# Altium PCB DB31.PcbDoc (part 5 of 8)
Units mil, origin at the board's own origin, x right, y up, seen from the top; angles counter-clockwise.
Board outline 3236.22 x 4456.69 mil, 8 copper layers (Top Layer, MidLayer1, MidLayer2, GND-Layer5, MidLayer3, VCC, MidLayer4, Bottom Layer), stack 61.8 mil thick; 226 components, 469 nets, 1815 pads, 1562 vias.
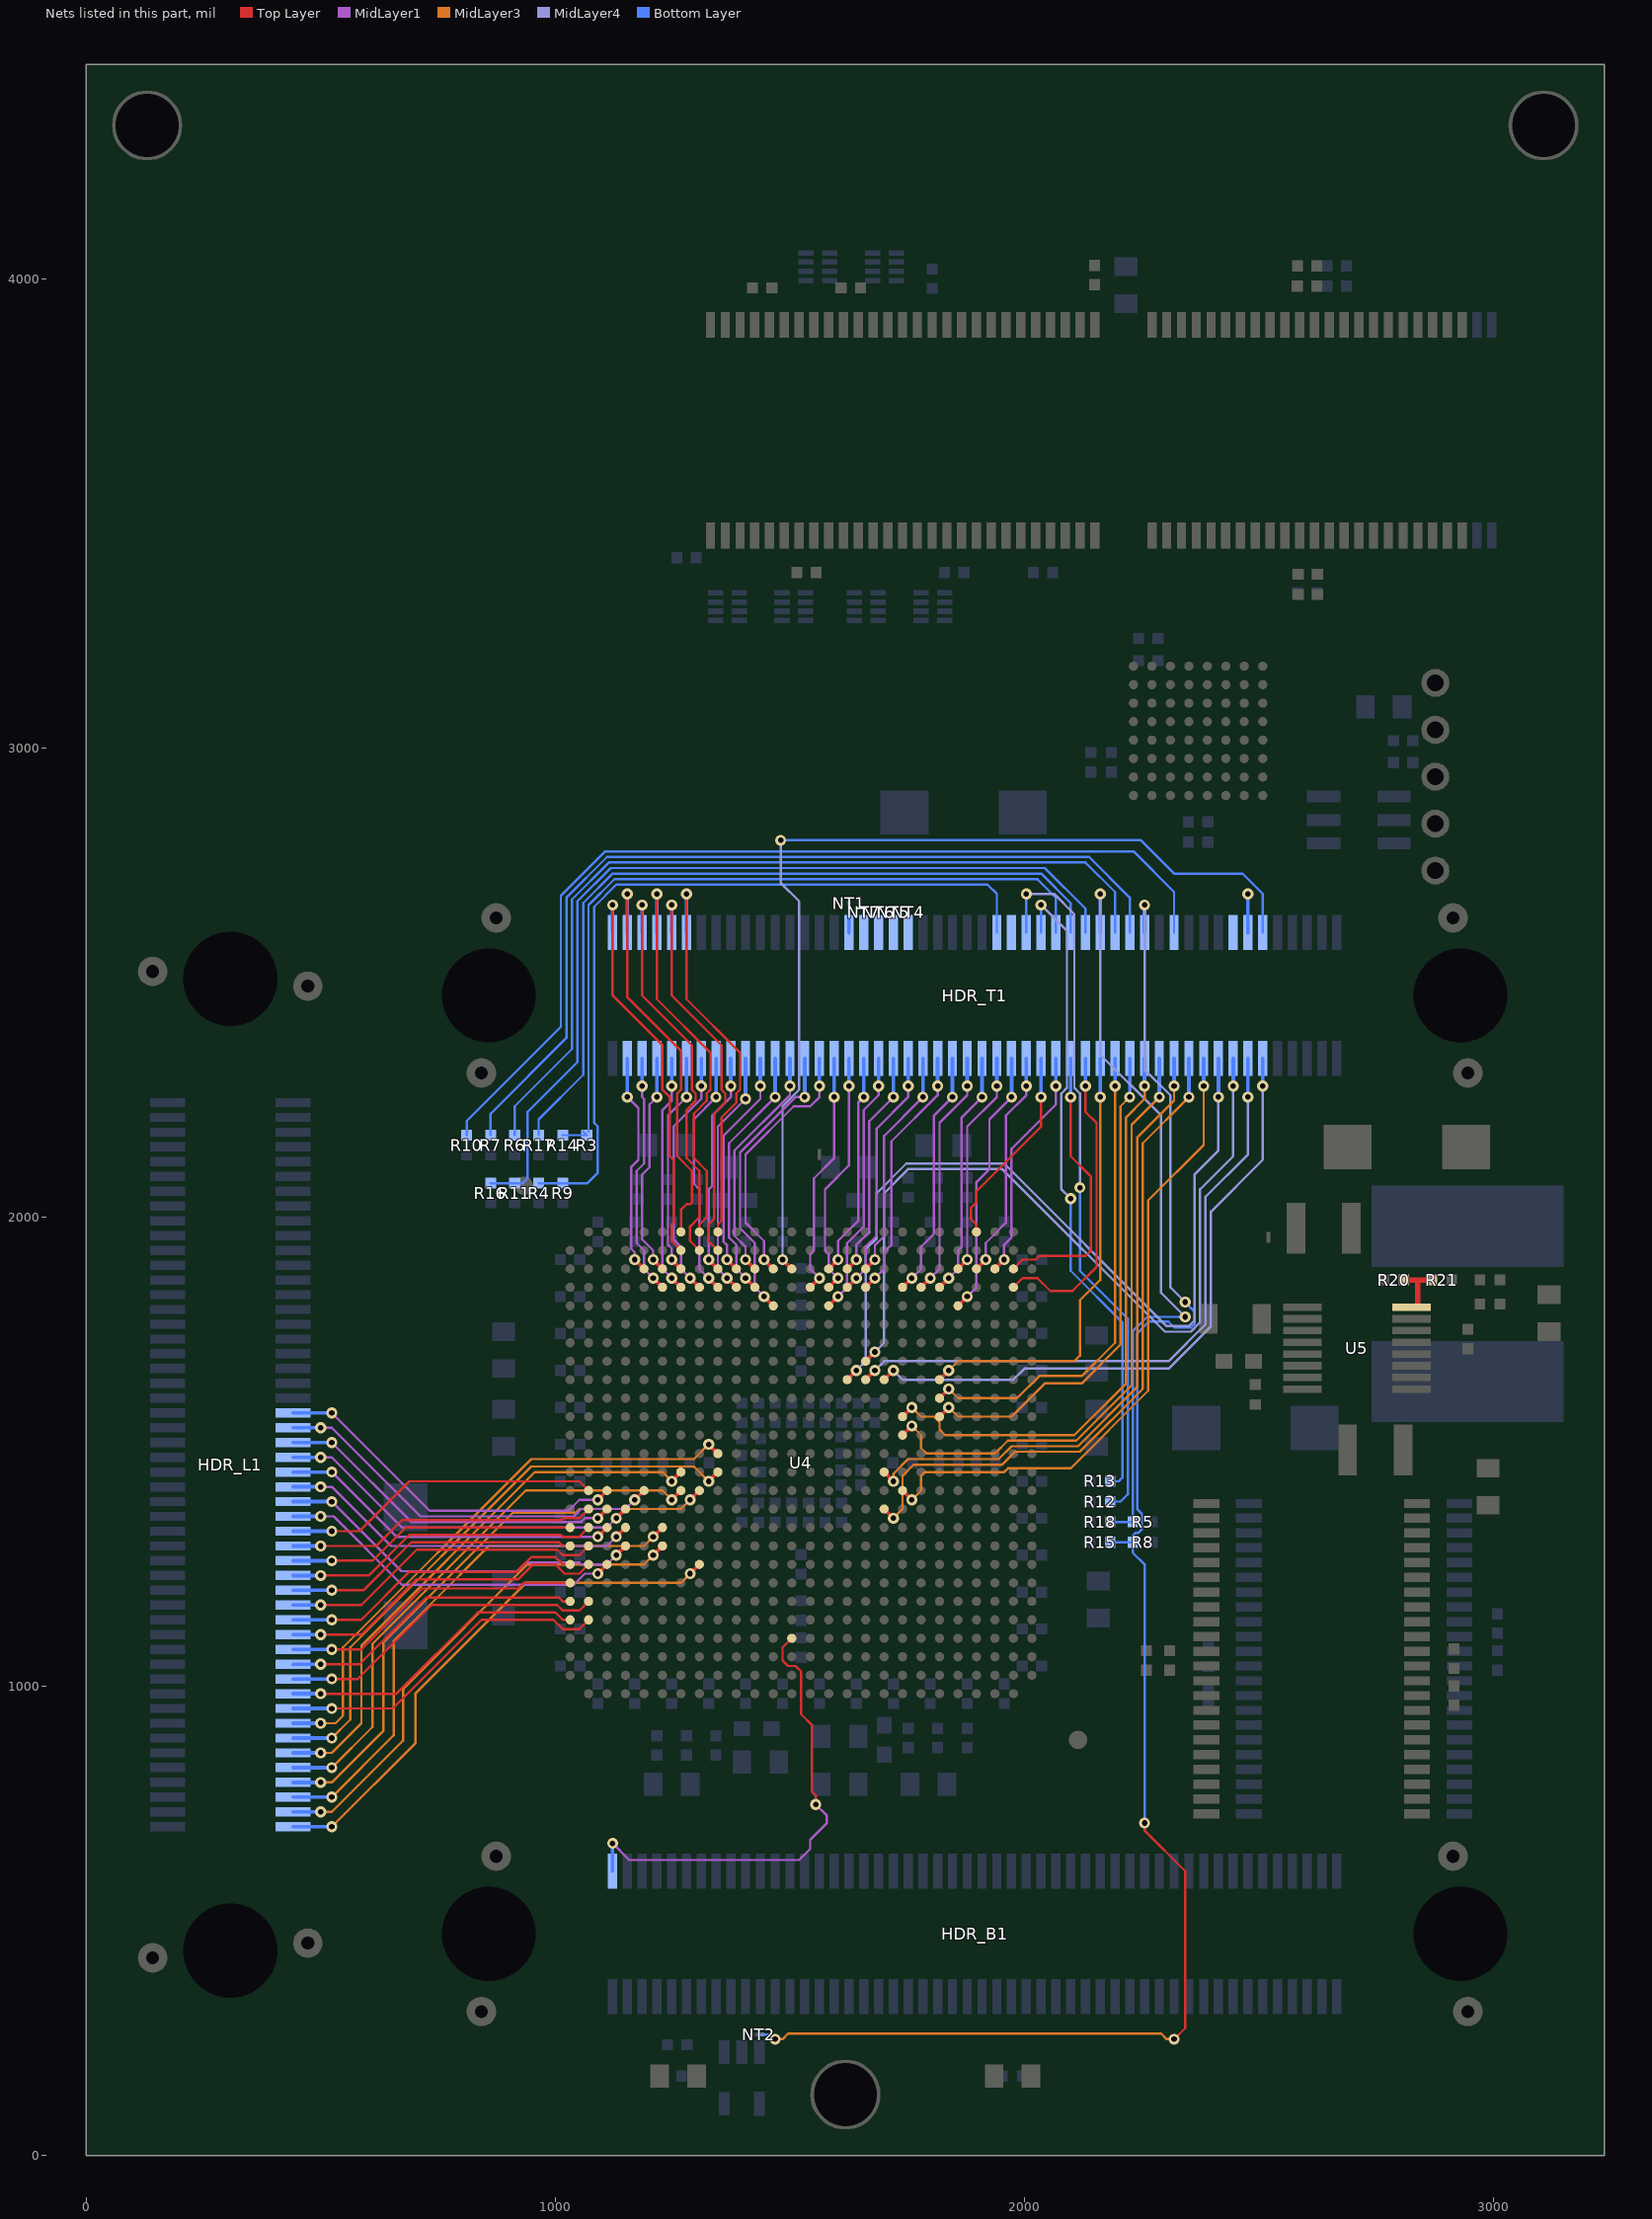
[diagram p11: the nets of this part, all layers, seen from the top]

## Via types
v1: diameter 23.62, hole 11.81, Top Layer to Bottom Layer, 947 vias
v2: diameter 23.62, hole 11.81, Top Layer to Bottom Layer, tented both sides, 476 vias
v3: diameter 27.56, hole 15.75, Top Layer to Bottom Layer, 138 vias
v4: diameter 23.62, hole 11.81, Top Layer to Bottom Layer, tented top, 1 vias

## Nets (pads, with @x,y where several pads share a name; then routed paths per layer and width w, separated by ;. In a path a pad name is that pad's centre, name@x,y a point inside that pad or via, vN(x,y) a via of type N, cw(c..) or ccw(c..) an arc to the next point about the centre after c; other vN are vias at no path point) (continued)
EXTEND_B21: HDR_L1.44 U4.R3 | length 773.7
  Top Layer w7.87: v1(1090.55,1397.64) U4.R3@1110.24,1417.32
  MidLayer1 w5: v2(523.62,1582.68) 732.28,1374.02 956.69,1374.02 968.5,1374.02 1027.56,1374.02 1051.18,1397.64 v1(1090.55,1397.64)
  Bottom Layer w7.87: HDR_L1.44@440.94,1582.67 v2(523.62,1582.68)
EXTEND_B22: HDR_L1.46 U4.R5 | length 849.1
  Top Layer w7.87: v1(1169.29,1397.64) U4.R5@1188.98,1417.32
  MidLayer1 w5: v2(500,1551.18) 523.62,1551.18 712.6,1362.2 956.69,1362.2 968.5,1362.2 1039.37,1362.2 1055.12,1377.95 1149.61,1377.95 v1(1169.29,1397.64)
  Bottom Layer w7.87: HDR_L1.46@440.94,1551.18 v2(500,1551.18)
EXTEND_B23: HDR_L1.48 U4.T3 | length 750.8
  Top Layer w7.87: v1(1090.55,1358.27) U4.T3@1110.24,1377.95
  MidLayer1 w5: v2(523.62,1519.68) 692.91,1350.39 956.69,1350.39 968.5,1350.39 1055.12,1350.39 1062.99,1358.27 v1(1090.55,1358.27)
  Bottom Layer w7.87: HDR_L1.48@440.94,1519.68 v2(523.62,1519.68)
EXTEND_B24: HDR_L1.50 U4.T4 | length 786.9
  Top Layer w7.87: v1(1129.92,1358.27) U4.T4@1149.61,1377.95
  MidLayer1 w5: v2(500,1488.19) 523.62,1488.19 673.23,1338.58 956.69,1338.58 968.5,1338.58 1110.24,1338.58 v1(1129.92,1358.27)
  Bottom Layer w7.87: HDR_L1.50@440.94,1488.19 v2(500,1488.19)
EXTEND_B25: HDR_L1.52 U4.U3 | length 734.5
  Top Layer w7.87: v1(1090.55,1318.9) U4.U3@1110.24,1338.58
  MidLayer1 w5: v2(523.62,1456.69) 661.42,1318.9 956.69,1318.9 968.5,1318.9 v1(1090.55,1318.9)
  Bottom Layer w7.87: HDR_L1.52@440.94,1456.69 v2(523.62,1456.69)
EXTEND_B26: HDR_L1.54 U4.U4 | length 777.2
  Top Layer w7.87: v1(1129.92,1318.9) U4.U4@1149.61,1338.58
  MidLayer1 w5: v2(500,1425.2) 523.62,1425.2 649.61,1299.21 956.69,1299.21 968.5,1299.21 1110.24,1299.21 v1(1129.92,1318.9)
  Bottom Layer w7.87: HDR_L1.54@440.94,1425.19 v2(500,1425.2)
EXTEND_B27: HDR_L1.56 U4.V4 | length 795.7
  Top Layer w7.87: v1(1129.92,1279.53) U4.V4@1149.61,1299.21
  MidLayer1 w5: v2(523.62,1393.7) 672,1245.32 918.55,1245.32 937.01,1263.78 956.69,1263.78 968.5,1263.78 1051.18,1263.78 1055.12,1259.84 1110.24,1259.84 v1(1129.92,1279.53)
  Bottom Layer w7.87: HDR_L1.56@440.94,1393.7 v2(523.62,1393.7)
EXTEND_B28: HDR_L1.58 U4.W3 | length 747.6
  Top Layer w7.87: v1(1090.55,1240.16) U4.W3@1110.24,1259.84
  MidLayer1 w5: v2(500,1362.21) 527.56,1362.21 673.23,1216.54 956.69,1216.54 968.5,1216.53 1039.37,1216.53 1062.99,1240.16 v1(1090.55,1240.16)
  Bottom Layer w7.87: HDR_L1.58@440.94,1362.2 v2(500,1362.21)
EXTEND_B29: HDR_L1.60 U4.R2 | length 682.1
  Top Layer w5: v2(523.62,1330.71) 582.68,1330.71 688.98,1437.01 956.69,1437.01 968.5,1437.01 1051.18,1437.01 U4.R2@1070.87,1417.32
  Bottom Layer w7.87: HDR_L1.60@440.94,1330.71 v2(523.62,1330.71)
EXTEND_B30: HDR_L1.62 U4.T2 | length 662.5
  Top Layer w5: v2(500,1299.21) 618.11,1299.21 673.23,1354.33 956.69,1354.33 968.5,1354.33 1012.8,1354.33 1016.73,1358.27 1051.18,1358.27 U4.T2@1070.87,1377.95
  Bottom Layer w7.87: HDR_L1.62@440.94,1299.21 v2(500,1299.21)
EXTEND_B31: HDR_L1.64 U4.U1 | length 619.9
  Top Layer w5: v2(523.62,1267.72) 610.24,1267.72 681.1,1338.58 956.69,1338.58 968.5,1338.58 U4.U1@1031.5,1338.58
  Bottom Layer w7.87: HDR_L1.64@440.94,1267.71 v2(523.62,1267.72)
EXTEND_B32: HDR_L1.66 U4.U2 | length 675.6
  Top Layer w5: v2(500,1236.22) 602.36,1236.22 688.98,1322.83 956.69,1322.83 968.5,1322.83 1011.81,1322.83 1015.75,1318.9 1051.18,1318.9 U4.U2@1070.87,1338.58
  Bottom Layer w7.87: HDR_L1.66@440.94,1236.22 v2(500,1236.22)
EXTEND_B33: HDR_L1.68 U4.V1 | length 636.2
  Top Layer w5: v2(523.62,1204.72) 590.55,1204.72 692.91,1307.09 956.69,1307.09 968.5,1307.09 1007.88,1307.09 1015.75,1299.21 U4.V1@1031.5,1299.21
  Bottom Layer w7.87: HDR_L1.68@440.94,1204.72 v2(523.62,1204.72)
EXTEND_B34: HDR_L1.70 U4.V2 | length 691.9
  Top Layer w5: v2(500,1173.23) 586.61,1173.23 704.72,1291.34 956.69,1291.34 968.5,1291.34 1003.94,1291.34 1015.75,1279.53 1051.18,1279.53 U4.V2@1070.87,1299.21
  Bottom Layer w7.87: HDR_L1.70@440.94,1173.23 v2(500,1173.23)
EXTEND_B35: HDR_L1.72 U4.W1 | length 652.5
  Top Layer w5: v2(523.62,1141.73) 586.61,1141.73 688.98,1244.1 917.32,1244.1 948.82,1275.59 956.69,1275.59 968.5,1275.59 1000,1275.59 1015.75,1259.84 U4.W1@1031.5,1259.84
  Bottom Layer w7.87: HDR_L1.72@440.94,1141.73 v2(523.62,1141.73)
EXTEND_B36: HDR_L1.74 U4.W2 | length 708.2
  Top Layer w5: v2(500,1110.24) 586.62,1110.24 704.72,1228.35 921.26,1228.35 952.76,1259.84 956.69,1259.84 968.5,1259.84 1000,1259.84 1019.68,1240.16 1051.18,1240.16 U4.W2@1070.87,1259.84
  Bottom Layer w7.87: HDR_L1.74@440.94,1110.23 v2(500,1110.24)
EXTEND_B37: HDR_L1.76 U4.Y1 | length 649.3
  Top Layer w5: v2(523.62,1078.74) 586.61,1078.74 716.54,1208.66 921.26,1208.66 933.07,1220.47 956.69,1220.47 968.5,1220.47 U4.Y1@1031.5,1220.47
  Bottom Layer w7.87: HDR_L1.76@440.94,1078.74 v2(523.62,1078.74)
EXTEND_B38: HDR_L1.78 U4.AA1 | length 652.5
  Top Layer w5: v2(500,1047.25) 582.68,1047.25 724.41,1188.98 956.69,1188.98 968.5,1188.98 1007.87,1188.98 1015.75,1181.1 U4.AA1@1031.5,1181.1
  Bottom Layer w7.87: HDR_L1.78@440.94,1047.24 v2(500,1047.25)
EXTEND_B39: HDR_L1.80 U4.AA2 | length 708.2
  Top Layer w5: v2(523.62,1015.75) 578.74,1015.75 736.22,1173.23 956.69,1173.23 968.5,1173.23 1003.94,1173.23 1015.75,1161.42 1051.18,1161.42 U4.AA2@1070.87,1181.1
  Bottom Layer w7.87: HDR_L1.80@440.94,1015.74 v2(523.62,1015.75)
EXTEND_B40: HDR_L1.82 U4.AB1 | length 668.8
  Top Layer w5: v2(500,984.25) 661.42,984.25 834.65,1157.48 956.69,1157.48 968.5,1157.48 1000,1157.48 1015.75,1141.73 U4.AB1@1031.5,1141.73
  Bottom Layer w7.87: HDR_L1.82@440.94,984.25 v2(500,984.25)
EXTEND_B41: HDR_L1.84 U4.AB2 | length 724.5
  Top Layer w5: v2(523.62,952.75) 653.54,952.75 842.52,1141.73 956.69,1141.73 968.5,1141.73 996.06,1141.73 1015.75,1122.05 1051.18,1122.05 U4.AB2@1070.87,1141.73
  Bottom Layer w7.87: HDR_L1.84@440.94,952.75 v2(523.62,952.75)
EXTEND_B42: HDR_L1.86 U4.N9 | length 1245.2
  Top Layer w7.87: v1(1326.77,1515.75) U4.N9@1346.46,1496.06
  MidLayer3 w5: v2(500,921.26) 531.5,921.26 547.24,937.01 547.24,1082.68 948.82,1484.25 956.69,1484.25 968.51,1484.25 1295.28,1484.25 v1(1326.77,1515.75)
  Bottom Layer w7.87: HDR_L1.86@440.94,921.26 v2(500,921.26)
EXTEND_B43: HDR_L1.88 U4.P9 | length 1256.4
  Top Layer w7.87: v1(1326.77,1437.01) U4.P9@1346.46,1456.69
  MidLayer3 w5: v2(523.62,889.76) 562.99,929.13 562.99,1082.68 948.82,1468.5 956.69,1468.5 968.51,1468.5 1295.27,1468.5 v1(1326.77,1437.01)
  Bottom Layer w7.87: HDR_L1.88@440.94,889.76 v2(523.62,889.76)
EXTEND_B44: HDR_L1.90 U4.P7 | length 1187.8
  Top Layer w7.87: v1(1248.03,1437.01) U4.P7@1267.72,1456.69
  MidLayer3 w5: v2(500,858.27) 523.62,858.27 586.61,921.26 586.61,1086.61 956.69,1456.69 968.51,1456.69 1228.35,1456.69 v1(1248.03,1437.01)
  Bottom Layer w7.87: HDR_L1.90@440.94,858.26 v2(500,858.27)
EXTEND_B45: HDR_L1.92 U4.R7 | length 1191.5
  Top Layer w7.87: v1(1248.03,1397.64) U4.R7@1267.72,1417.32
  MidLayer3 w5: v2(523.62,826.77) 610.24,913.38 610.24,1090.55 937.01,1417.32 956.69,1417.32 968.51,1417.32 1228.35,1417.32 v1(1248.03,1397.64)
  Bottom Layer w7.87: HDR_L1.92@440.94,826.77 v2(523.62,826.77)
EXTEND_B46: HDR_L1.94 U4.R8 | length 1234.5
  Top Layer w7.87: v1(1287.4,1397.64) U4.R8@1307.09,1417.32
  MidLayer3 w5: v2(500,795.28) 523.62,795.28 633.86,905.51 633.86,1094.49 909.45,1370.08 956.69,1370.08 968.51,1370.08 1043.3,1370.08 1051.18,1377.95 1192.91,1377.95 1267.72,1377.95 v1(1287.4,1397.64)
  Bottom Layer w7.87: HDR_L1.94@440.94,795.27 v2(500,795.28)
EXTEND_B47: HDR_L1.96 U4.U6 | length 1143.1
  Top Layer w7.87: v1(1208.66,1318.9) U4.U6@1228.35,1338.58
  MidLayer3 w5: v2(523.62,763.78) 655.23,895.39 655.23,1096.17 732.28,1173.23 858.27,1299.21 956.69,1299.21 968.51,1299.22 1188.98,1299.21 v1(1208.66,1318.9)
  Bottom Layer w7.87: HDR_L1.96@440.95,763.78 v2(523.62,763.78)
EXTEND_B48: HDR_L1.98 U4.V6 | length 1086.8
  Top Layer w7.87: v1(1208.66,1279.53) U4.V6@1228.35,1299.21
  MidLayer3 w5: v2(500,732.28) 523.62,732.28 675.28,883.94 675.28,994.17 940.94,1259.84 956.69,1259.84 968.51,1259.84 1188.98,1259.84 v1(1208.66,1279.53)
  Bottom Layer w7.87: HDR_L1.98@440.94,732.28 v2(500,732.28)
EXTEND_B49: HDR_L1.100 U4.W8 | length 1160
  Top Layer w7.87: v1(1287.4,1240.16) U4.W8@1307.09,1259.84
  MidLayer3 w5: v2(523.62,700.79) 702.1,879.26 702.1,985.56 937.01,1220.47 956.69,1220.47 968.51,1220.47 1267.72,1220.47 v1(1287.4,1240.16)
  Bottom Layer w7.87: HDR_L1.100@440.94,700.78 v2(523.62,700.79)
EXTEND_C0: HDR_T1.89 U4.J18 | length 1436
  Top Layer w7.87: U4.J18@1700.79,1653.54 v1(1720.47,1673.23)
  MidLayer4 w5: v1(1720.47,1673.23) 1740.16,1653.54 1976.38,1653.54 2000,1677.16 2078.74,1677.16 2090.55,1677.17 2307.09,1677.17 2397.64,1767.72 2397.64,2011.81 2507.87,2122.05 v2(2507.87,2279.53)
  Bottom Layer w7.87: v2(2507.87,2279.53) HDR_T1.89@2507.88,2338.58 v2(2507.87,2279.53)
EXTEND_C1: HDR_T1.87 U4.J17 | length 1377.8
  Top Layer w7.87: U4.J17@1661.42,1653.54 v1(1681.1,1673.23)
  MidLayer4 w5: v1(1681.1,1673.23) 1700.79,1692.91 2078.74,1692.91 2090.55,1692.91 2307.09,1692.91 2385.83,1771.65 2385.83,2043.31 2476.38,2133.86 v2(2476.38,2255.9)
  Bottom Layer w7.87: v2(2476.38,2255.9) HDR_T1.87@2476.38,2338.58
EXTEND_C2: HDR_T1.85 U4.H17 | length 1813
  Top Layer w7.87: U4.H17@1661.42,1692.91 v1(1681.1,1712.6)
  MidLayer4 w5: v1(1681.1,1712.6) 1700.79,1732.28 1700.79,2031.5 1700.79,2042.32 1700.79,2051.18 1751.97,2102.36 1952.76,2102.36 2299.21,1755.91 2354.33,1755.91 2374.02,1775.59 2374.02,2059.06 2444.88,2129.92 v2(2444.88,2279.53)
  Bottom Layer w7.87: v2(2444.88,2279.53) HDR_T1.85@2444.88,2338.58
EXTEND_C3: HDR_T1.83 U4.J16 | length 1855.6
  Top Layer w7.87: U4.J16@1622.05,1653.54 v1(1641.73,1673.23)
  MidLayer4 w5: v1(1641.73,1673.23) 1661.42,1692.91 1661.42,1931.1 1685.04,1954.72 1685.04,2031.5 1685.04,2042.32 1685.04,2051.18 1748.03,2114.17 1956.69,2114.17 2303.15,1767.72 2350.39,1767.72 2362.2,1779.53 2362.2,2090.55 2413.38,2141.73 v2(2413.38,2255.9)
  Bottom Layer w7.87: v2(2413.38,2255.9) HDR_T1.83@2413.39,2338.58
EXTEND_C4: HDR_T1.81 U4.R19 | length 1404.1
  Top Layer w7.87: U4.R19@1740.16,1417.32 v1(1759.84,1397.64)
  MidLayer3 w5: v1@1760.03,1397.46 1779.89,1417.32 1779.89,1449.18 1787.4,1456.69 1956.69,1456.69 1964.57,1464.57 2078.74,1464.57 2090.55,1464.57 2098.43,1464.57 2263.78,1629.92 2263.78,2035.43 2381.89,2153.54 v2(2381.89,2279.53)
  Bottom Layer w7.87: v2(2381.89,2279.53) HDR_T1.81@2381.89,2338.58
EXTEND_C5: HDR_T1.79 U4.T18 | length 1460.5
  Top Layer w7.87: U4.T18@1700.79,1377.95 v1(1720.47,1358.27)
  MidLayer3 w5: v1(1720.47,1358.27) 1740.16,1377.95 1740.16,1448.82 1763.78,1472.44 1952.76,1472.44 1980.32,1500 2078.74,1500 2090.55,1500 2118.11,1500 2251.97,1633.86 2251.97,2157.48 v2(2350.39,2255.9)
  Bottom Layer w7.87: v2(2350.39,2255.9) HDR_T1.79@2350.4,2338.58
EXTEND_C6: HDR_T1.77 U4.P18 | length 1373.3
  Top Layer w7.87: U4.P18@1700.79,1456.69 v1(1720.47,1437.01)
  MidLayer3 w5: v1(1720.47,1437.01) 1720.48,1452.76 1751.97,1484.25 1944.88,1484.25 1972.44,1511.81 2078.74,1511.81 2090.55,1511.81 2114.17,1511.81 2240.16,1637.8 2240.16,2169.29 2318.89,2248.03 v2(2318.89,2279.53)
  Bottom Layer w7.87: v2(2318.89,2279.53) HDR_T1.77@2318.9,2338.58
EXTEND_C7: HDR_T1.75 U4.M19 | length 1318.6
  Top Layer w7.87: U4.M19@1740.16,1535.43 v1(1759.84,1555.12)
  MidLayer3 w5: v1(1759.84,1555.12) 1779.53,1535.44 1779.53,1507.87 1791.34,1496.06 1937.01,1496.06 1964.57,1523.62 2078.74,1523.62 2090.55,1523.62 2110.24,1523.62 2228.35,1641.73 2228.35,2196.85 v2(2287.4,2255.9)
  Bottom Layer w7.87: v2(2287.4,2255.9) HDR_T1.75@2287.4,2338.58
EXTEND_C8: HDR_T1.73 U4.L19 | length 1273.1
  Top Layer w7.87: U4.L19@1740.16,1574.8 v1(1759.84,1594.49)
  MidLayer3 w5: v1(1759.84,1594.49) 1779.53,1574.8 1807.09,1574.8 1818.9,1562.99 1818.9,1547.24 1830.71,1535.43 2078.74,1535.43 2090.55,1535.43 2106.3,1535.43 2216.54,1645.67 2216.54,2212.6 2255.9,2251.97 v2(2255.9,2279.53)
  Bottom Layer w7.87: v2(2255.9,2279.53) HDR_T1.73@2255.91,2338.58
EXTEND_C9: HDR_T1.71 U4.L21 | length 1084.1
  Top Layer w7.87: U4.L21@1818.9,1574.8 v1(1838.59,1594.49)
  MidLayer3 w5: v1(1838.59,1594.49) 1858.27,1574.8 1972.44,1574.8 2043.31,1645.67 2078.74,1645.67 2090.55,1645.67 2122.05,1645.67 2204.72,1728.35 2204.72,2236.22 v2(2224.41,2255.9)
  Bottom Layer w7.87: v2(2224.41,2255.9) HDR_T1.71@2224.41,2338.58
EXTEND_C10: HDR_T1.69 U4.K21 | length 1045.5
  Top Layer w7.87: U4.K21@1818.9,1614.17 v1(1838.59,1633.86)
  MidLayer3 w5: v1(1838.59,1633.86) 1858.27,1614.17 1913.39,1614.17 1984.25,1614.17 2031.5,1661.42 2078.74,1661.42 2090.55,1661.42 2122.05,1661.42 2192.91,1732.28 v2(2192.91,2279.53)
  Bottom Layer w7.87: v2(2192.91,2279.53) HDR_T1.69@2192.91,2338.58
EXTEND_C11: HDR_T1.67 U4.J21 | length 972.2
  Top Layer w7.87: U4.J21@1818.9,1653.54 v1(1838.59,1673.23)
  MidLayer3 w5: v1(1838.59,1673.23) 1858.27,1692.91 2078.74,1692.91 2090.55,1692.91 2106.3,1692.91 2118.11,1704.72 2118.11,1822.83 2161.42,1866.14 v2(2161.42,2255.9)
  Bottom Layer w7.87: v2(2161.42,2255.9) HDR_T1.67@2161.42,2338.58
EXTEND_C12: HDR_T1.65 U4.D25 | length 672.6
  Top Layer w5: U4.D25@1976.38,1850.39 1996.06,1870.08 2027.56,1870.08 2055.12,1842.52 2078.74,1842.52 2090.55,1842.52 2102.36,1842.52 2153.54,1893.7 2153.54,2200.79 2129.92,2224.41 v2(2129.92,2279.53)
  Bottom Layer w7.87: v2(2129.92,2279.53) HDR_T1.65@2129.92,2338.58
EXTEND_C13: HDR_T1.63 U4.C25 | length 609
  Top Layer w5: U4.C25@1976.38,1889.76 1996.06,1909.45 2023.62,1909.45 2031.5,1917.32 2078.74,1917.32 2090.55,1917.32 2129.92,1917.32 2141.73,1929.13 2141.73,2086.61 2098.42,2129.92 v2(2098.42,2255.9)
  Bottom Layer w7.87: v2(2098.42,2255.9) HDR_T1.63@2098.43,2338.58
EXTEND_C14: HDR_T1.61 U4.C24 | length 502.6
  Top Layer w7.87: U4.C24@1937.01,1889.76 v1(1956.7,1909.45)
  MidLayer1 w5: v1(1956.7,1909.45) 1956.69,1940.95 1972.44,1956.69 1972.44,2031.5 1972.44,2039.37 1972.44,2145.67 2066.93,2240.16 v2(2066.93,2279.53)
  Bottom Layer w7.87: v2(2066.93,2279.53) HDR_T1.61@2066.93,2338.58
EXTEND_C15: HDR_T1.59 U4.A23 | length 436.9
  Top Layer w5: U4.A23@1897.64,1968.5 1897.64,1984.25 1885.83,1996.06 1885.83,2019.69 1897.64,2031.5 1897.64,2039.37 1897.64,2055.12 2035.43,2192.91 v2(2035.43,2255.9)
  Bottom Layer w7.87: v2(2035.43,2255.9) HDR_T1.59@2035.43,2338.58
EXTEND_C16: HDR_T1.57 U4.C23 | length 492.8
  Top Layer w7.87: U4.C23@1897.64,1889.76 v1(1917.33,1909.45)
  MidLayer1 w5: v1(1917.33,1909.45) 1917.32,1944.88 1960.63,1988.19 1960.63,2031.5 1960.63,2039.37 1960.63,2216.53 2003.94,2259.84 v2(2003.93,2279.53)
  Bottom Layer w7.87: v2(2003.93,2279.53) HDR_T1.57@2003.94,2338.58
EXTEND_C17: HDR_T1.55 U4.E22 | length 574.8
  Top Layer w7.87: U4.E22@1858.27,1811.02 v1(1877.95,1830.71)
  MidLayer1 w5: v1(1877.95,1830.71) 1897.64,1850.39 1897.64,2031.5 1897.64,2039.37 1897.64,2074.8 1925.2,2102.36 1925.2,2208.66 v2(1972.44,2255.9)
  Bottom Layer w7.87: v2(1972.44,2255.9) HDR_T1.55@1972.44,2338.58
EXTEND_C18: HDR_T1.53 U4.C22 | length 483.1
  Top Layer w7.87: U4.C22@1858.27,1889.76 v1(1877.95,1909.45)
  MidLayer1 w5: v1(1877.95,1909.45) 1877.95,2031.5 1877.95,2039.37 1877.95,2192.91 1940.94,2255.9 v2(1940.94,2279.53)
  Bottom Layer w7.87: v2(1940.94,2279.53) HDR_T1.53@1940.95,2338.58
EXTEND_C19: HDR_T1.51 U4.D21 | length 525.7
  Top Layer w7.87: U4.D21@1818.9,1850.39 v1(1838.59,1870.08)
  MidLayer1 w5: v1(1838.59,1870.08) 1858.27,1889.76 1858.27,1929.13 1866.14,1937.01 1866.14,2031.5 1866.14,2039.37 1866.14,2212.6 v2(1909.45,2255.9)
  Bottom Layer w7.87: v2(1909.45,2255.9) HDR_T1.51@1909.45,2338.58
EXTEND_C20: HDR_T1.49 U4.D20 | length 529
  Top Layer w7.87: U4.D20@1779.53,1850.39 v1(1799.22,1870.08)
  MidLayer1 w5: v1(1799.22,1870.08) 1818.9,1889.76 1818.9,2031.5 1818.9,2039.37 1818.9,2200.79 1877.95,2259.84 v2(1877.95,2279.53)
  Bottom Layer w7.87: v2(1877.95,2279.53) HDR_T1.49@1877.95,2338.58
EXTEND_C21: HDR_T1.47 U4.D19 | length 532.2
  Top Layer w7.87: U4.D19@1740.16,1850.39 v1(1759.84,1870.08)
  MidLayer1 w5: v1(1759.84,1870.08) 1779.53,1889.76 1779.53,1937.01 1807.09,1964.57 1807.09,2031.5 1807.09,2039.37 1807.09,2216.54 v2(1846.46,2255.9)
  Bottom Layer w7.87: v2(1846.46,2255.9) HDR_T1.47@1846.46,2338.58
EXTEND_C22: HDR_T1.45 U4.D17 | length 551.8
  Top Layer w7.87: U4.D17@1661.42,1850.39 v1(1681.1,1870.08)
  MidLayer1 w5: v1(1681.1,1870.08) 1700.79,1889.76 1700.79,1925.2 1716.54,1940.95 1716.54,2031.5 1716.54,2039.37 1716.54,2161.42 1814.96,2259.84 v2(1814.96,2279.53)
  Bottom Layer w7.87: v2(1814.96,2279.53) HDR_T1.45@1814.96,2338.58
EXTEND_C23: HDR_T1.43 U4.C17 | length 499.4
  Top Layer w7.87: U4.C17@1661.42,1889.76 v1(1681.1,1909.45)
  MidLayer1 w5: v1(1681.1,1909.45) 1681.1,1939.96 1700.79,1959.65 1700.79,2031.5 1700.79,2039.37 1700.79,2173.23 v2(1783.46,2255.9)
  Bottom Layer w7.87: v2(1783.46,2255.9) HDR_T1.43@1783.47,2338.58
EXTEND_C24: HDR_T1.41 U4.D16 | length 542
  Top Layer w7.87: U4.D16@1622.05,1850.39 v1(1641.73,1870.08)
  MidLayer1 w5: v1(1641.73,1870.08) 1661.42,1889.76 1661.42,1937.01 1685.04,1960.63 1685.04,2031.5 1685.04,2039.37 1685.04,2188.98 1751.97,2255.9 v2(1751.97,2279.53)
  Bottom Layer w7.87: v2(1751.97,2279.53) HDR_T1.41@1751.97,2338.58
EXTEND_C25: HDR_T1.39 U4.C16 | length 562
  Top Layer w7.87: U4.C16@1622.05,1889.76 v1(1641.73,1909.45)
  MidLayer1 w5: v1(1641.73,1909.45) 1641.73,1940.94 1669.29,1968.5 1669.29,2031.5 1669.29,2039.37 1669.29,2204.72 ; 1669.29,2204.72 v2(1720.47,2255.9) 1669.29,2204.72
  Bottom Layer w7.87: v2(1720.47,2255.9) HDR_T1.39@1720.47,2338.58
EXTEND_C26: HDR_T1.37 U4.E15 | length 571.6
  Top Layer w7.87: U4.E15@1582.68,1811.02 v1(1602.36,1830.71)
  MidLayer1 w5: v1(1602.36,1830.71) 1622.05,1850.39 1622.05,1944.88 1657.48,1980.31 1657.48,2031.5 1657.48,2039.37 1657.48,2228.35 1688.98,2259.84 v2(1688.97,2279.53)
  Bottom Layer w7.87: v2(1688.97,2279.53) HDR_T1.37@1688.98,2338.58
EXTEND_C27: HDR_T1.35 U4.C15 | length 479.8
  Top Layer w7.87: U4.C15@1582.68,1889.76 v1(1602.36,1909.45)
  MidLayer1 w5: v1(1602.36,1909.45) 1602.36,1948.82 1645.67,1992.13 1645.67,2031.5 1645.67,2039.37 1645.67,2244.09 v2(1657.48,2255.9)
  Bottom Layer w7.87: v2(1657.48,2255.9) HDR_T1.35@1657.48,2338.58
EXTEND_C28: HDR_T1.33 U4.D15 | length 529
  Top Layer w7.87: U4.D15@1582.68,1850.39 v1(1602.36,1870.08)
  MidLayer1 w5: v1(1602.36,1870.08) 1582.68,1889.77 1582.68,1921.26 1574.8,1929.13 1574.8,2031.5 1574.8,2039.37 1574.8,2059.06 1625.98,2110.23 v2(1625.98,2279.53)
  Bottom Layer w7.87: v2(1625.98,2279.53) HDR_T1.33@1625.99,2338.58
EXTEND_C29: HDR_T1.31 U4.D14 | length 525.7
  Top Layer w7.87: U4.D14@1543.31,1850.39 v1(1562.99,1870.08)
  MidLayer1 w5: v1(1562.99,1870.08) 1543.31,1889.77 1543.31,1921.26 1551.18,1929.13 1551.18,2031.5 1551.18,2039.37 1551.18,2082.68 1594.49,2125.98 v2(1594.49,2255.9)
  Bottom Layer w7.87: v2(1594.49,2255.9) HDR_T1.31@1594.49,2338.58
EXTEND_C30: HDR_T1.29 U4.C12 | length 559.3
  Top Layer w7.87: v1(1444.88,1909.45) U4.C12@1464.57,1889.76
  MidLayer1 w5: v1(1444.88,1909.45) 1444.88,1948.82 1405.51,1988.19 1405.51,2031.5 1405.51,2039.37 1405.51,2133.86 1507.87,2236.22 1543.31,2236.22 1562.99,2255.9 v2(1562.99,2279.53)
  Bottom Layer w7.87: v2(1562.99,2279.53) HDR_T1.29@1562.99,2338.58
EXTEND_C31: HDR_T1.27 U4.E12 | length 625.5
  Top Layer w7.87: v1(1444.88,1830.71) U4.E12@1464.57,1811.02
  MidLayer1 w5: v1(1444.88,1830.71) 1425.2,1850.39 1425.2,1944.88 1393.7,1976.38 1393.7,2031.5 1393.7,2039.37 1393.7,2137.8 1511.81,2255.9 v2(1531.5,2255.9)
  Bottom Layer w7.87: v2(1531.5,2255.9) HDR_T1.27@1531.5,2338.58
EXTEND_C32: HDR_T1.25 U4.C11 | length 515.7
  Top Layer w7.87: v1(1405.51,1909.45) U4.C11@1425.2,1889.76
  MidLayer1 w5: v1(1405.51,1909.45) 1405.51,1937.01 1381.89,1960.63 1381.89,2031.5 1381.89,2039.37 1381.89,2141.73 1500,2259.84 v2(1500,2279.53)
  Bottom Layer w7.87: v2(1500,2279.53) HDR_T1.25@1500,2338.58
EXTEND_C33: HDR_T1.23 U4.D11 | length 551.8
  Top Layer w7.87: v1(1405.51,1870.08) U4.D11@1425.2,1850.39
  MidLayer1 w5: v1(1405.51,1870.08) 1385.83,1889.76 1385.83,1940.94 1370.08,1956.69 1370.08,2031.5 1370.08,2039.37 1370.08,2157.48 v2(1468.5,2255.9)
  Bottom Layer w7.87: v2(1468.5,2255.9) HDR_T1.23@1468.5,2338.58
EXTEND_C34: HDR_T1.21 U4.C10 | length 492.9
  Top Layer w7.87: v1(1366.14,1909.45) U4.C10@1385.83,1889.76
  MidLayer1 w5: v1(1366.14,1909.45) 1366.14,1939.96 1358.27,1947.83 1358.27,2031.5 1358.27,2039.37 1358.27,2173.23 1437.01,2251.97 v2(1437.01,2279.53)
  Bottom Layer w7.87: v2(1437.01,2279.53) HDR_T1.21@1437.01,2338.58
EXTEND_C35: HDR_T1.19 U4.D10 | length 525
  Top Layer w7.87: v1(1366.14,1870.08) U4.D10@1385.83,1850.39
  MidLayer1 w5: v1(1366.14,1870.08) 1346.46,1889.76 1346.46,2031.5 1346.46,2039.37 1346.46,2192.91 v2(1405.51,2251.97)
  Bottom Layer w7.87: v2@1405.51,2255.9 HDR_T1.19@1405.51,2338.58
EXTEND_C36: HDR_T1.17 U4.C9 | length 476.5
  Top Layer w7.87: v1(1326.77,1909.45) U4.C9@1346.46,1889.76
  MidLayer1 w5: v1(1326.77,1909.45) 1326.77,2031.49 1326.77,2039.37 1326.77,2059.05 1334.65,2066.93 1334.65,2216.54 1374.02,2255.91 v2(1374.02,2279.53)
  Bottom Layer w7.87: v2(1374.02,2279.53) HDR_T1.17@1374.02,2338.58
EXTEND_C37: HDR_T1.15 U4.D9 | length 529
  Top Layer w7.87: v1(1326.77,1870.08) U4.D9@1346.46,1850.39
  MidLayer1 w5: v1(1326.77,1870.08) 1307.09,1889.76 1307.09,2031.5 1307.09,2039.37 1307.09,2059.06 1295.28,2070.87 1295.28,2208.66 v2(1342.52,2255.9)
  Bottom Layer w7.87: v2(1342.52,2255.9) HDR_T1.15@1342.52,2338.58
EXTEND_C38: HDR_T1.13 U4.D8 | length 535.5
  Top Layer w7.87: v1(1287.4,1870.08) U4.D8@1307.09,1850.39
  MidLayer1 w5: v1(1287.4,1870.08) 1267.72,1889.76 1267.72,1937.01 1251.97,1952.76 1251.97,2031.5 1251.97,2039.37 1251.97,2192.91 1311.02,2251.97 v2(1311.02,2279.53)
  Bottom Layer w7.87: v2(1311.02,2279.53) HDR_T1.13@1311.02,2338.58
EXTEND_C39: HDR_T1.11 U4.C7 | length 476.5
  Top Layer w7.87: v1(1248.03,1909.45) U4.C7@1267.72,1889.76
  MidLayer1 w5: v1(1248.03,1909.45) 1248.03,1933.07 1240.16,1940.94 1240.16,2031.5 1240.16,2039.37 1240.16,2216.53 v2(1279.53,2255.9)
  Bottom Layer w7.87: v2(1279.53,2255.9) HDR_T1.11@1279.53,2338.58
EXTEND_C40: HDR_T1.12 U4.A9 | length 870
  Top Layer w5: v2(1279.53,2688.98) 1279.53,2464.57 1393.7,2350.39 1393.7,2271.65 1385.83,2263.78 1385.83,2244.09 1354.33,2212.6 1354.33,2043.31 1354.33,2031.5 1354.33,1992.13 1346.46,1984.25 U4.A9@1346.46,1968.5
  Bottom Layer w7.87: HDR_T1.12@1279.53,2606.3 v2(1279.53,2688.98)
EXTEND_C41: HDR_T1.9 U4.D7 | length 512.6
  Top Layer w7.87: v1(1248.03,1870.08) U4.D7@1267.72,1850.39
  MidLayer1 w5: v1(1248.03,1870.08) 1228.35,1889.76 1228.35,2031.5 1228.35,2039.37 1228.35,2228.35 1248.03,2248.03 v2(1248.03,2279.53)
  Bottom Layer w7.87: v2(1248.03,2279.53) HDR_T1.9@1248.03,2338.58
EXTEND_C42: HDR_T1.10 U4.B9 | length 865.4
  Top Layer w5: v2(1248.03,2665.35) 1248.03,2472.44 1354.33,2366.14 1354.33,2271.65 1362.2,2263.78 1362.2,2244.09 1338.58,2220.47 1338.58,2043.31 1338.58,2031.5 1338.58,1996.06 1326.77,1984.25 1326.77,1948.82 U4.B9@1346.46,1929.13
  Bottom Layer w7.87: HDR_T1.10@1248.03,2606.3 v2(1248.03,2665.35)
EXTEND_C43: HDR_T1.7 U4.C6 | length 479.8
  Top Layer w7.87: v1(1208.66,1909.45) U4.C6@1228.35,1889.76
  MidLayer1 w5: v1(1208.66,1909.45) 1208.66,1929.13 1185.04,1952.75 1185.04,2031.5 1185.04,2039.37 1185.04,2090.55 1200.79,2106.3 1200.79,2240.16 v2(1216.54,2255.9)
  Bottom Layer w7.87: v2(1216.54,2255.9) HDR_T1.7@1216.54,2338.58
EXTEND_C44: HDR_T1.8 U4.A8 | length 883.1
  Top Layer w5: v2(1216.54,2688.98) 1216.54,2464.57 1330.71,2350.39 1330.71,2271.65 1322.83,2263.78 1322.83,2248.03 1295.28,2220.47 1295.28,2125.98 1322.83,2098.43 1322.83,2043.31 1322.83,2031.5 1322.83,2000 1307.09,1984.25 U4.A8@1307.09,1968.5
  Bottom Layer w7.87: HDR_T1.8@1216.54,2606.3 v2(1216.54,2688.98)
EXTEND_C45: HDR_T1.5 U4.D6 | length 519.2
  Top Layer w7.87: v1(1208.66,1870.08) U4.D6@1228.35,1850.39
  MidLayer1 w5: v2(1185.04,2279.53) 1185.04,2255.91 1188.98,2251.97 1188.98,2114.17 1173.23,2098.43 1173.23,2039.37 1173.23,2031.5 1173.23,1944.88 1188.98,1929.13 1188.98,1889.76 v1(1208.66,1870.08)
  Bottom Layer w7.87: v2(1185.04,2279.53) HDR_T1.5@1185.04,2338.58
EXTEND_C46: HDR_T1.6 U4.B8 | length 937.5
  Top Layer w5: v2(1185.04,2665.35) 1185.04,2472.44 1291.34,2366.14 1291.34,2271.65 1299.21,2263.78 1299.21,2248.03 1279.53,2228.35 1279.53,2125.98 1307.09,2098.43 1307.09,2043.31 1307.09,2031.5 1307.09,2000 1287.4,1980.32 1287.4,1948.82 U4.B8@1307.09,1929.13
  Bottom Layer w7.87: HDR_T1.6@1185.04,2606.3 v2(1185.04,2665.35) HDR_T1.6@1185.04,2606.3
EXTEND_C47: HDR_T1.3 U4.C5 | length 476.5
  Top Layer w7.87: v1(1169.29,1909.45) U4.C5@1188.98,1889.76
  MidLayer1 w5: v2(1153.54,2255.9) 1177.17,2232.28 1177.17,2122.05 1161.42,2106.3 1161.42,2039.37 1161.42,2031.5 1161.42,1933.07 1169.29,1925.2 v1(1169.29,1909.45)
  Bottom Layer w7.87: v2(1153.54,2255.9) HDR_T1.3@1153.54,2338.58
EXTEND_C48: HDR_T1.4 U4.A7 | length 940.2
  Top Layer w5: v2(1153.54,2688.98) 1153.54,2468.5 1267.72,2354.33 1267.72,2271.65 1259.84,2263.78 1259.84,2129.92 1291.34,2098.43 1291.34,2043.31 1291.34,2031.5 1287.4,2027.56 1279.53,2027.56 1267.72,2015.75 U4.A7@1267.72,1968.5
  Bottom Layer w7.87: 1153.54,2665.35 HDR_T1.4@1153.54,2606.3 v2(1153.54,2688.98)
EXTEND_C49: HDR_T1.2 U4.B7 | length 858.9
  Top Layer w5: v2(1122.05,2665.35) 1122.05,2472.44 1228.35,2366.14 1228.35,2271.65 1244.09,2255.91 1244.09,2129.92 1251.97,2122.05 1251.97,2043.31 1251.97,2031.5 1251.97,1988.19 1248.03,1984.25 1248.03,1948.82 U4.B7@1267.72,1929.13
  Bottom Layer w7.87: HDR_T1.2@1122.05,2606.3 v2(1122.05,2665.35)
FB: R20.2 R21.1 U5.8 | length 120.2
  Top Layer w7.87: U5.8@2842.51,1807.09 U5.8@2842.51,1808.25
  Top Layer w11.81: R20.2@2808.58,1866.14 2838.58,1866.14 ; U5.8@2838.58,1807.09 2838.58,1808.25 2838.58,1866.14 ; R21.1@2868.58,1866.14 2838.58,1866.14
FPGA_CCLK: HDR_T1.66 R11.1 R16.1 | length 1916.7
  Bottom Layer w5: R16.1@862.2,2072.36 R11.1@913.38,2072.36 930.63,2072.36 940.94,2082.68 940.94,2224.41 1047.24,2330.71 1047.24,2673.23 1118.11,2744.09 2043.31,2744.09 2129.92,2657.48 HDR_T1.66@2129.92,2606.3
FPGA_CLK: HDR_B1.2 U4.AC13 | length 1024.8
  Top Layer w5: U4.AC13@1503.94,1102.36 1484.25,1082.68 1484.25,1055.12 1496.06,1043.31 1511.81,1043.31 1523.62,1031.5 1523.62,940.95 1547.24,917.32 1547.24,775.59 1555.12,767.72 v1(1555.12,748.03)
  MidLayer1 w5: v2(1122.05,665.35) 1157.48,629.92 1519.69,629.92 1543.31,653.54 1543.31,673.23 1578.74,708.66 1578.74,724.41 v1(1555.12,748.03)
  Bottom Layer w7.87: HDR_B1.2@1122.05,606.3 v2(1122.05,665.35)
FPGA_CLK1: HDR_T1.90 U4.C13 | length 2110.1
  Top Layer w7.87: v1(1484.25,1909.45) U4.C13@1503.94,1889.76
  MidLayer4 w5: v1(1480.31,2803.15) 1480.31,2712.6 1519.68,2673.23 1519.68,2271.65 1484.25,2236.22 v1(1484.25,1909.45)
  Bottom Layer w5: v1(1480.31,2803.15) 2248.03,2803.15 2318.9,2732.28 2464.57,2732.28 2507.87,2688.98 HDR_T1.90@2507.88,2606.3
FPGA_DIN: HDR_T1.64 R17.1 | length 1688.3
  Bottom Layer w5: R17.1@964.56,2174.72 964.56,2208.66 1059.55,2303.64 1059.55,2669.79 1122.04,2732.28 2035.43,2732.28 2098.43,2669.29 HDR_T1.64@2098.43,2606.3
FPGA_DONE: HDR_T1.74 NT2.2 R8.1 R15.1 | length 3652.1
  Top Layer w5: v1(2255.91,708.66) 2255.91,692.91 2342.52,606.3 2342.52,271.65 v1(2318.9,248.03)
  MidLayer3 w5: v1(1468.5,248.03) 1484.25,248.03 1496.06,259.84 2291.34,259.84 2303.15,248.03 v1(2318.9,248.03)
  MidLayer4 w5: v2(2255.9,2665.35) 2255.9,2314.96 2311.02,2259.84 2311.02,1850.39 v1(2342.52,1818.9)
  Bottom Layer w5: NT2.2@1441.93,257.87 1458.66,257.87 v1(1468.5,248.03) ; R15.1@2182.59,1307.08 R8.1@2230.78,1307.08 ; v1(2255.91,708.66) 2255.91,1259.84 2230.78,1284.97 R8.1@2230.78,1307.08 ; v1(2342.52,1818.9) 2362.2,1799.21 2362.2,1771.65 2355.26,1764.71 2319.37,1764.71 2306.68,1777.4 2265.46,1777.4 2240.78,1752.72 2240.78,1377.23 2250.44,1367.57 2250.44,1334.89 2242.32,1326.77 2236.22,1326.77 2230.78,1321.33 R8.1@2230.78,1307.08
  Bottom Layer w7.87: HDR_T1.74@2255.91,2606.3 v2(2255.9,2665.35)
FPGA_ID0: HDR_T1.42 NT4.1
FPGA_ID1: HDR_T1.40 NT5.1
FPGA_ID2: HDR_T1.38 NT6.1
FPGA_ID3: HDR_T1.36 NT7.1
FPGA_INIT: HDR_T1.68 R5.1 R18.1 | length 1638.3
  MidLayer4 w5: v2(2161.42,2688.98) 2161.42,2346.46 2291.34,2216.54 2291.34,1838.58 v1(2342.52,1787.4)
  Bottom Layer w5: R18.1@2182.59,1350.39 R5.1@2230.78,1350.39 2230.78,1756.86 2261.32,1787.4 v1(2342.52,1787.4)
  Bottom Layer w7.87: HDR_T1.68@2161.42,2606.3 v2(2161.42,2688.98)
FPGA_INSTALLED: HDR_T1.34 NT1.1 | length 59.1
  Bottom Layer w7.87: HDR_T1.34@1625.99,2606.3 1625.98,2661.42 NT1.1@1625.98,2657.48
FPGA_M0: HDR_T1.60 R13.1 | length 1390.4
  MidLayer4 w5: v2(2035.43,2665.35) 2090.55,2610.24 2090.55,2275.59 2078.74,2263.78 2078.74,2059.06 v2(2098.43,2039.37)
  Bottom Layer w5: HDR_T1.60@2035.43,2606.3 v2(2035.43,2665.35) ; v2(2098.43,2039.37) 2098.42,1885.83 2208.66,1775.59 2208.66,1444.88 2200.78,1437 R13.1@2182.59,1437
FPGA_M1: HDR_T1.58 R12.1 | length 1530.9
  MidLayer4 w5: v2(2003.94,2688.98) 2062.99,2688.98 2106.3,2645.67 2106.3,2275.59 2118.11,2263.78 v2(2118.11,2062.99)
  Bottom Layer w5: HDR_T1.58@2003.94,2606.3 v2(2003.94,2688.98) ; v2(2118.11,2062.99) 2118.11,1885.83 2220.47,1783.46 2220.47,1409.45 2204.72,1393.7 R12.1@2182.59,1393.7
FPGA_M2: HDR_T1.56
FPGA_PROG_CLK: HDR_T1.88 | length 82.7
  Bottom Layer w7.87: HDR_T1.88@2476.38,2606.3 v2(2476.38,2688.98)
FPGA_PROG_PWR_ON: HDR_T1.86
FPGA_PROGRAM: HDR_T1.62 R3.1 R14.1 | length 1655.1
  Bottom Layer w5: R14.1@1015.75,2174.72 R3.1@1066.93,2174.72 R3.1@1059.05,2182.59 ; R3.1@1070.87,2182.59 1070.87,2665.35 1125.98,2720.47 2027.56,2720.47 2066.93,2681.1 HDR_T1.62@2066.93,2606.3
FPGA_TCK: HDR_T1.72 R7.1 | length 1920.6
  Bottom Layer w5: R7.1@862.2,2174.72 862.2,2220.47 1023.62,2381.89 1023.62,2681.1 1110.24,2767.72 2137.8,2767.72 2224.41,2681.1 HDR_T1.72@2224.41,2606.3
FPGA_TDI: HDR_T1.78 R10.1 | length 2062.2
  Bottom Layer w5: R10.1@811.02,2174.72 811.02,2204.72 1011.81,2405.51 1011.81,2685.04 1106.3,2779.53 2232.28,2779.53 2318.9,2692.91 HDR_T1.78@2318.9,2606.3
FPGA_TDO: HDR_T1.54 R4.1 R9.1 | length 1674
  Bottom Layer w5: R4.1@964.56,2072.36 1068.42,2072.36 1090.55,2094.49 1090.55,2192.91 1082.68,2200.79 1082.68,2661.42 1129.92,2708.66 1921.26,2708.66 1940.95,2688.98 HDR_T1.54@1940.95,2606.3
FPGA_TMS: HDR_T1.70 R6.1 | length 1855.8
  Bottom Layer w5: R6.1@913.38,2174.72 913.39,2236.22 1035.43,2358.27 1035.43,2677.17 1114.17,2755.91 2129.92,2755.91 2192.91,2692.91 HDR_T1.70@2192.91,2606.3